# Altium PCB Carrier_Board_pcb.PcbDoc (part 2 of 2)
Units mm, origin at the board's own origin, x right, y up, seen from the top; angles counter-clockwise.
Board outline 152.4 x 101.6 mm, 4 copper layers (Top Layer, Power, Ground, Bottom Layer), stack 0.603 mm thick; 85 components, 79 nets, 632 pads, 232 vias.
Unrouted connection lines stored in the file: 1.
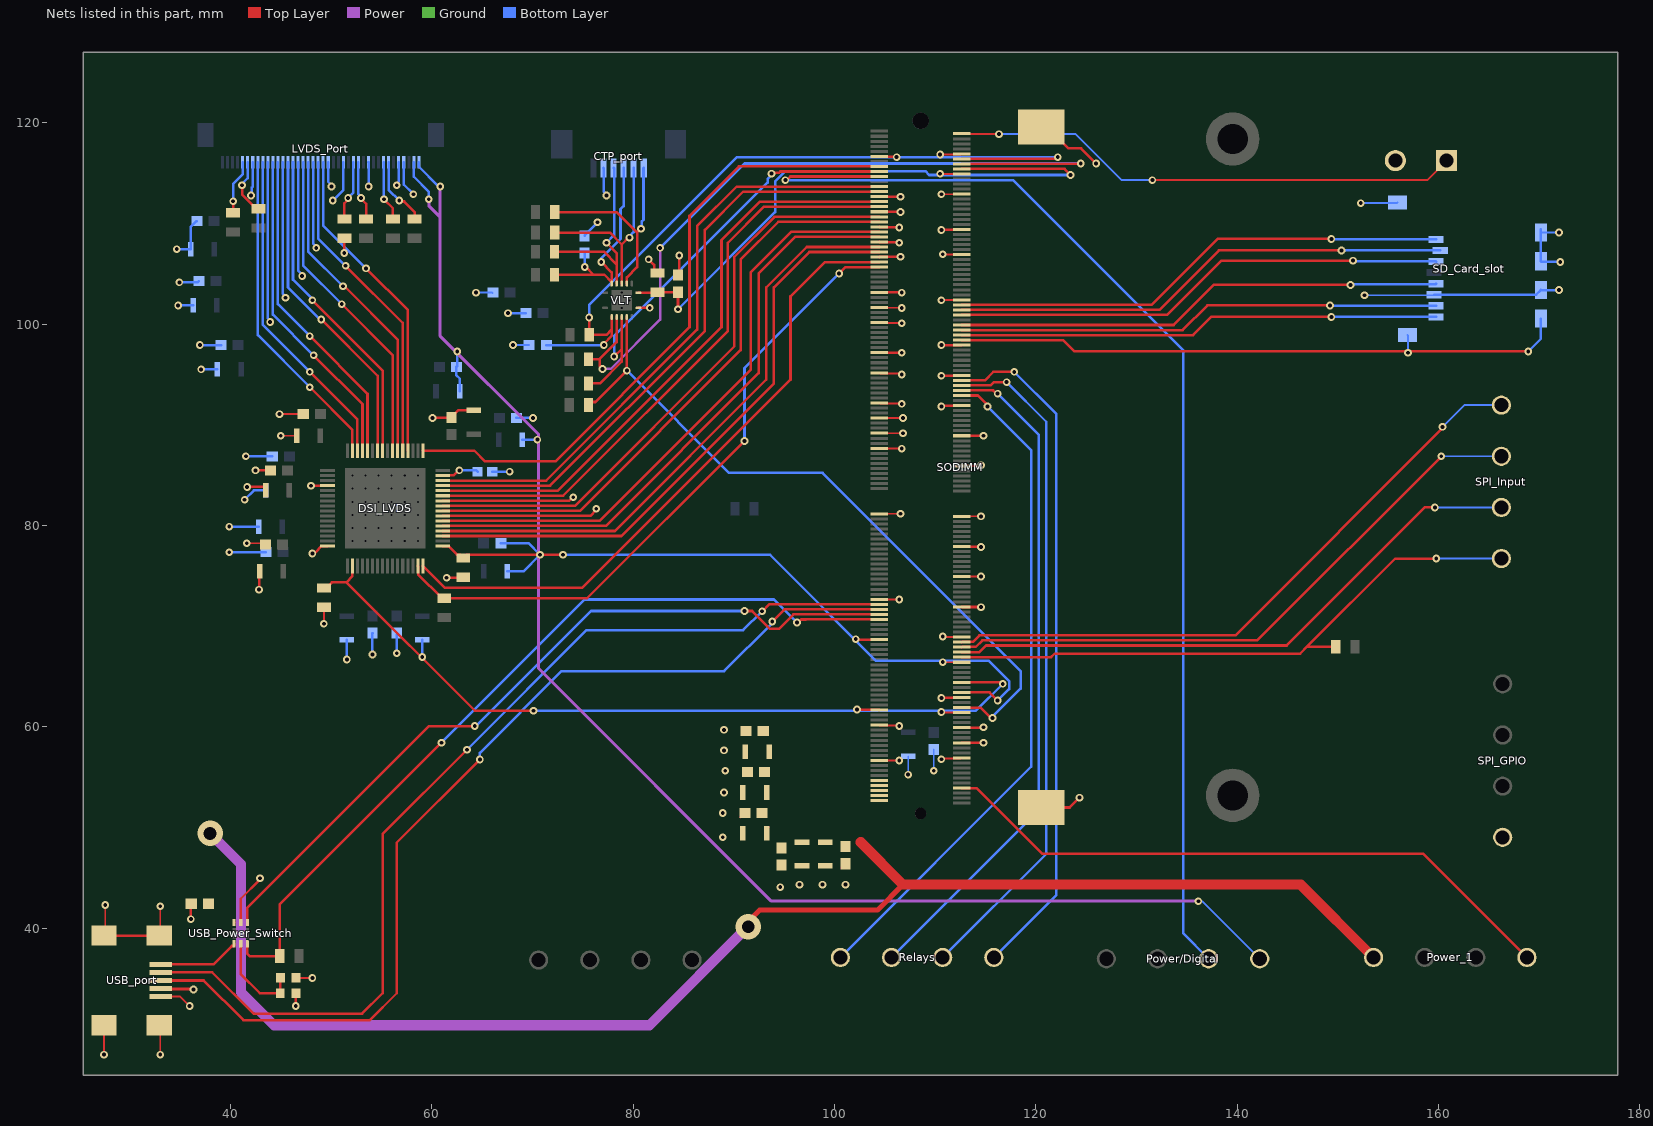
[diagram p4: the nets of this part, all layers, seen from the top]

## Via types
v1: diameter 0.762, hole 0.381, Top Layer to Bottom Layer, 83 vias
v2: diameter 0.762, hole 0.381, Top Layer to Ground, 82 vias
v3: diameter 0.762, hole 0.381, Ground to Bottom Layer, 41 vias
v4: diameter 0.762, hole 0.381, Top Layer to Power, 16 vias
v5: diameter 0.762, hole 0.381, Power to Bottom Layer, 8 vias
v6: diameter 2.54, hole 1.27, Top Layer to Power, 2 vias

## Nets (pads, with @x,y where several pads share a name; then routed paths per layer and width w, separated by ;. In a path a pad name is that pad's centre, name@x,y a point inside that pad or via, vN(x,y) a via of type N, cw(c..) or ccw(c..) an arc to the next point about the centre after c; other vN are vias at no path point) (continued)
GND: C1.1 C2.1 C3.1 C4.2 C5.2 C6.2 C7.2 C8.2 C9.2 C10.2 C11.2 C12.2 C13.2 C14.2 C15.2 C16.1 C17.1 C18.2 C19.2 C20.2 C21.2 C22.2 C23.2 C24.1 C25.1 C26.1 C27.2 C28.2 C29.2 C30.2 C31.2 C32.2 C33.2 C34.2 C35.2 C36.2 C37.2 C38.2 C39.2 C40.2 C41.2 C42.2 C43.2 C44.2 C45.2 C46.2 C47.1 CTP_port.2 DSI_LVDS.23 DSI_LVDS.26 DSI_LVDS.52 DSI_LVDS.64 GND/TEST.02 LVDS_Port.7 LVDS_Port.10 LVDS_Port.13 LVDS_Port.16 LVDS_Port.19 LVDS_Port.22 LVDS_Port.25 LVDS_Port.30 LVDS_Port.36 LVDS_Port.37 R5.2 R9.1 R10.1 R12.1 R22.2 R23.2 SD_Card_slot.6 SD_Card_slot.9 SD_Card_slot.10 SD_Card_slot.11 SD_Card_slot.13 SD_Card_slot.14 SODIMM.10 SODIMM.11 SODIMM.18 SODIMM.26 SODIMM.27 SODIMM.33 SODIMM.39 SODIMM.40 SODIMM.45 SODIMM.50 SODIMM.51 SODIMM.65 SODIMM.68 SODIMM.71 SODIMM.77 SODIMM.86 SODIMM.89 SODIMM.97 SODIMM.98 SODIMM.109 SODIMM.110 SODIMM.115 SODIMM.121 SODIMM.122 SODIMM.127 SODIMM.134 SODIMM.145 SODIMM.146 SODIMM.158 SODIMM.170 SODIMM.179 SODIMM.182 SODIMM.194 SODIMM.195 SODIMM.204 SODIMM.218 SODIMM.223 SODIMM.224 SODIMM.229 SODIMM.230 SODIMM.236 SODIMM.242 SODIMM.243 SODIMM.SH1 SODIMM.SH2 SPI_GPIO.4 USB_port.4 USB_port.5 USB_port.6 USB_port.7 USB_port.8 USB_port.9 USB_Power_Switch.5 VLT.7 | length 357.2
  Top Layer w0.178: v2(27.432,27.432) USB_port.9@27.433,30.348 USB_port.9@27.433,30.348 ; USB_port.8@27.433,39.248 27.559,39.374 v2(27.559,42.291) ; USB_port.7@32.933,30.348 33.02,30.261 v2(33.02,27.432) ; USB_port.6@32.933,39.248 33.02,39.335 v2(33.02,42.164) ; USB_port.5@33.058,33.198 35.001,33.198 v2(35.941,32.258) ; v2(41.617,78.232) 43.346,78.232 43.219,78.359 C12.2@43.522,78.359 ; v2(44.866,91.059) C11.2@47.23,91.059 ; v2(44.993,88.9) C34.2@46.574,88.9 ; R22.2@46.518,35.052 v2(48.133,35.052) ; v2(49.276,70.231) R10.1@49.276,71.877 ; C20.2@90.637,50.996 90.637,51.024 91.048,51.435 C20.2@91.098,51.435 ; C19.2@91.175,59.563 C19.2@91.225,59.563 C19.2@91.528,59.866 ; C18.2@91.302,55.499 C18.2@91.352,55.499 ; C22.2@100.681,45.939 101.092,46.35 C22.2@101.092,46.394 ; SODIMM.243@104.449,56.658 104.457,56.65 106.418,56.65 v2(106.426,56.642) ; SODIMM.229@104.449,60.158 104.493,60.115 106.382,60.115 v2(106.426,60.071) ; SODIMM.179@104.449,72.658 104.456,72.651 106.419,72.651 v2(106.426,72.644) ; SODIMM.145@104.449,81.158 104.452,81.155 106.551,81.155 v2(106.553,81.153) ; SODIMM.127@104.449,87.658 104.463,87.644 106.666,87.644 v2(106.68,87.63) ; SODIMM.121@104.449,89.158 104.451,89.156 106.805,89.156 v2(106.807,89.154) ; SODIMM.115@104.449,90.658 104.459,90.668 106.797,90.668 v2(106.807,90.678) ; SODIMM.109@104.449,92.158 104.491,92.117 106.638,92.117 v2(106.68,92.075) ; SODIMM.97@104.449,95.158 104.51,95.097 106.579,95.097 v2(106.68,94.996) ; SODIMM.77@104.449,100.158 104.49,100.117 106.639,100.117 v2(106.68,100.076) ; SODIMM.71@104.449,101.658 104.478,101.629 106.651,101.629 v2(106.68,101.6) ; v2(110.49,114.935) 110.504,114.921 112.635,114.921 SODIMM.18@112.649,114.908 ; v2(110.49,116.84) 111.759,116.84 111.766,116.847 112.588,116.847 SODIMM.10@112.649,116.908 ; v2(110.617,56.769) 110.695,56.847 112.588,56.847 SODIMM.242@112.649,56.908 ; v2(110.617,61.468) 110.677,61.408 SODIMM.224@112.649,61.408 ; v2(110.617,102.362) 110.64,102.385 112.626,102.385 SODIMM.68@112.649,102.408 ; v2(110.617,112.903) 110.619,112.905 112.647,112.905 SODIMM.26@112.649,112.908 ; v2(110.744,66.421) 110.751,66.414 112.642,66.414 SODIMM.204@112.649,66.408 ; v2(110.744,68.961) 110.797,68.908 SODIMM.194@112.649,68.908 ; v2(110.744,106.934) 110.757,106.921 112.636,106.921 SODIMM.50@112.649,106.908 ; SODIMM.170@112.649,74.908 112.66,74.919 114.543,74.919 v2(114.554,74.93) ; SODIMM.146@112.649,80.908 112.653,80.903 114.55,80.903 v2(114.554,80.899)
  Top Layer w0.254: USB_port.8@27.433,39.248 USB_port.6@32.933,39.248 ; USB_port.4@33.058,33.998 33.102,33.954 36.277,33.954 v2(36.322,33.909) ; v2(36.068,40.894) 36.068,42.379 C26.1@36.107,42.418 ; USB_Power_Switch.5@41.021,40.547 41.021,42.916 42.926,44.821 v2(42.926,44.958) ; v2(41.656,83.82) 43.344,83.82 43.493,83.67 C29.2@43.493,83.475 ; v2(42.48,85.471) C13.2@43.981,85.471 ; v2(42.834,73.625) 42.862,73.653 C35.2@42.862,75.41 ; v2(46.482,32.258) 46.5,32.276 R23.2@46.5,33.528 ; R23.2@46.482,33.51 R23.2@46.5,33.528 ; R23.2@46.518,33.546 R23.2@46.5,33.528 ; v2(48.006,83.947) DSI_LVDS.52@49.637,83.947 ; v2(48.133,77.216) 48.23,77.313 48.428,77.313 49.062,77.947 DSI_LVDS.64@49.637,77.947 ; v2(51.308,107.061) R12.1@51.308,108.519 ; v2(60.071,90.678) 61.927,90.678 C10.2@61.976,90.727 ; DSI_LVDS.23@61.087,80.947 75.75,80.947 76.327,81.524 v2(76.327,81.661) ; DSI_LVDS.26@61.087,82.447 73.638,82.447 73.995,82.804 v2(74.041,82.804) ; v2(61.468,74.803) 63.058,74.803 R9.1@63.119,74.864 ; C10.2@61.976,90.777 62.622,91.423 C33.2@64.177,91.423 ; VLT.7@80.517,101.612 v2@81.649,101.612 ; v2(81.534,106.426) 82.073,105.887 82.073,105.401 82.406,105.068 R5.2@82.423,105.068 ; C2.1@84.455,104.863 84.582,104.99 84.582,106.691 84.524,106.749 v2(84.582,106.807) ; v2(102.108,68.707) 102.157,68.658 SODIMM.195@104.449,68.658 ; v2(102.235,61.722) 102.276,61.681 104.426,61.681 SODIMM.223@104.449,61.658 ; SODIMM.89@104.449,97.158 SODIMM.89@104.449,97.158 106.679,97.156 v2(106.68,97.155) ; SODIMM.65@104.449,103.158 104.466,103.141 106.663,103.141 v2(106.68,103.124) ; SODIMM.51@104.449,106.658 104.46,106.669 106.542,106.669 v2(106.553,106.68) ; SODIMM.45@104.449,108.158 104.472,108.135 106.368,108.135 v2(106.426,108.077) ; SODIMM.39@104.449,109.658 104.472,109.635 106.392,109.635 v2(106.426,109.601) ; SODIMM.33@104.449,111.158 104.466,111.142 106.536,111.142 v2(106.553,111.125) ; SODIMM.27@104.449,112.658 106.544,112.658 v2(106.553,112.649) ; SODIMM.11@104.449,116.658 104.472,116.635 106.123,116.635 v2(106.172,116.586) ; v2(110.617,62.865) 110.638,62.886 112.628,62.886 SODIMM.218@112.649,62.908 ; v2(110.617,91.821) 110.681,91.885 112.626,91.885 SODIMM.110@112.649,91.908 ; v2(110.617,94.869) 110.637,94.889 112.629,94.889 SODIMM.98@112.649,94.908 ; v2(110.617,97.917) 110.621,97.913 112.645,97.913 SODIMM.86@112.649,97.908 ; v2(110.617,109.347) 110.655,109.385 112.626,109.385 SODIMM.40@112.649,109.408 ; SODIMM.236@112.649,58.408 112.655,58.414 114.802,58.414 v2(114.808,58.42) ; SODIMM.230@112.649,59.908 114.772,59.908 v2(114.808,59.944) ; SODIMM.182@112.649,71.908 112.662,71.895 114.541,71.895 v2(114.554,71.882) ; SODIMM.158@112.649,77.908 112.672,77.885 114.52,77.885 v2(114.554,77.851) ; SODIMM.134@112.649,85.908 112.672,85.931 114.506,85.931 v2(114.554,85.979) ; SODIMM.122@112.649,88.908 112.653,88.904 114.804,88.904 v2(114.808,88.9) ; SODIMM.SH2@120.549,51.983 123.357,51.983 v2(124.333,52.959) ; SODIMM.SH1@120.549,119.583 121.786,118.346 122.336,118.346 123.237,117.445 124.49,117.445 v2(125.984,115.951) ; SPI_GPIO.4@166.306,48.959 SPI_GPIO.4@166.37,49.022
  Ground w0.178: v3(45.466,102.616) v3@45.578,102.728 ; v3@53.657,113.602 v3(53.721,113.665) v3@53.785,113.602 ; v2(61.468,74.803) v2@61.626,74.803 ; v2@124.284,53.008 v2(124.333,52.959) v2@124.445,53.071
  Bottom Layer w0.178: v3(64.389,103.124) 66.001,103.124 C3.1@66.04,103.085 ; v3(68.072,97.917) C24.1@69.674,97.917 ; v3(107.315,55.245) C44.2@107.315,57.079 ; v3(109.855,55.626) C23.2@109.855,57.736 ; v3(152.273,112.014) 155.863,112.014 SD_Card_slot.13@155.914,112.065 ; v3(152.654,102.87) 159.523,102.87 SD_Card_slot.6@159.566,102.913 ; SD_Card_slot.14@156.914,98.915 156.972,98.857 v3(156.972,97.155) ; SD_Card_slot.9@170.17,109.089 170.174,109.093 v3(171.958,109.093)
  Bottom Layer w0.254: v3(34.671,107.442) C45.2@36.033,107.442 36.033,109.665 36.604,110.236 C16.1@36.654,110.236 ; v3(34.798,101.854) C46.2@36.287,101.854 ; v3(34.925,104.14) 36.742,104.14 C17.1@36.869,104.267 ; v3(36.957,97.917) C9.2@39.06,97.917 ; v3(37.084,95.504) C32.2@38.7,95.504 ; v3(39.878,77.343) C15.2@43.512,77.343 ; v3(39.878,79.883) C38.2@42.799,79.883 ; v3(41.402,82.55) 42.327,83.475 C37.2@43.493,83.475 ; v3(41.529,86.868) 44.147,86.868 C14.2@44.15,86.865 ; v3(42.037,112.776) 42.093,112.832 42.093,113.546 42.212,113.665 LVDS_Port.7@42.212,116.078 ; LVDS_Port.10@43.712,116.078 43.712,100.57 43.942,100.34 v3(43.942,100.203) ; LVDS_Port.13@45.212,116.078 45.212,103.007 45.466,102.753 v3(45.466,102.616) ; LVDS_Port.16@46.712,116.078 46.712,105.317 47.117,104.912 v3(47.117,104.775) ; LVDS_Port.19@48.212,116.078 48.212,108.008 48.514,107.706 v3(48.514,107.569) ; LVDS_Port.22@49.712,116.078 49.712,114.128 50.038,113.802 v3(50.038,113.665) ; v3(50.165,112.268) 51.212,113.315 LVDS_Port.25@51.212,116.078 ; v3(51.562,66.675) C27.2@51.562,68.639 ; LVDS_Port.30@53.712,116.078 53.717,116.074 53.717,113.669 v3(53.721,113.665) ; v3(54.102,67.183) 54.102,69.293 C4.2@54.105,69.296 ; v3(56.515,67.31) C5.2@56.515,69.293 ; v3(56.515,113.792) 56.515,113.929 56.712,114.126 LVDS_Port.36@56.712,116.078 ; LVDS_Port.37@57.212,116.078 57.212,113.857 v3(58.166,112.903) ; v3(59.055,66.929) C28.2@59.055,68.636 ; C8.2@62.445,95.758 62.445,94.908 62.773,94.58 C31.2@62.773,93.345 ; C8.2@62.523,95.836 v3(62.523,97.282) ; C47.1@66.003,85.344 v3(67.728,85.344) ; C6.2@66.851,78.232 69.596,78.232 v3(70.739,77.089) 69.088,75.438 C36.2@67.508,75.438 ; v3(67.564,101.092) C25.1@69.342,101.092 ; C7.2@68.414,90.678 v3(70.051,90.678) ; C30.2@68.996,88.519 v3(70.485,88.519) ; C1.1@75.184,108.761 75.184,108.811 76.454,110.081 v3(76.454,110.109) ; CTP_port.2@77.051,115.506 77.07,115.487 77.07,113.186 77.343,112.913 v3(77.343,112.776) ; SD_Card_slot.6@159.566,102.913 169.7,102.913 170.17,103.383 SD_Card_slot.11@170.17,103.389 170.181,103.378 v3(171.958,103.378) ; SD_Card_slot.9@170.17,109.394 SD_Card_slot.9@170.17,109.089 SD_Card_slot.10@170.17,106.239 170.237,106.172 v3(172.085,106.172)
  other v2: 94.615,44.069 96.52,44.323 98.806,44.323 101.092,44.323 88.9,49.022 88.9,51.435 89.027,53.467 89.154,55.626 89.027,57.658 89.027,59.69 81.655,101.606
LCD_BL_PWM_carrier: Power/Digital.2 SODIMM.19 | length 117.5
  Top Layer w0.254: v1(95.123,114.3) 95.26,114.3 95.618,114.658 SODIMM.19@104.449,114.658
  Bottom Layer w0.254: v1(95.123,114.3) 117.729,114.3 134.62,97.409 134.62,39.497 Power/Digital.2@137.16,36.957
LED_Backlight: LVDS_Port.39 LVDS_Port.40 Power/Digital.1 | length 145.4
  Power w0.178: v5(59.69,112.395) v5@59.703,112.382
  Power w0.305: v5@59.703,112.382 59.703,111.747 60.833,110.617 ; v5(60.833,113.665) 60.833,110.617 ; v5(136.144,42.672) 93.726,42.672 70.612,65.786 70.612,89.027 60.833,98.806 60.833,110.617
  Bottom Layer w0.178: v5(136.144,42.672) 136.525,42.672 Power/Digital.1@142.24,36.957
  Bottom Layer w0.254: LVDS_Port.39@58.212,116.078 58.212,114.635 59.69,113.157 v5(59.69,112.395) ; LVDS_Port.40@58.712,116.078 58.712,115.628 60.578,113.762 60.736,113.762 v5(60.833,113.665)
NetC1_2: C1.2 CTP_port.4 R18.2 VLT.13 | length 21.5
  Top Layer w0.254: R18.2@72.2,104.902 76.073,104.902 ; v1(75.184,105.664) 75.311,105.664 76.073,104.902 ; v1(76.835,106.172) 77.867,105.14 VLT.13@77.867,104.178 ; VLT.13@77.867,104.138 VLT.13@77.867,104.012 VLT.13@77.867,104.178 ; 76.073,104.902 77.143,104.902 VLT.13@77.867,104.178
  Bottom Layer w0.254: v1(75.184,105.664) C1.2@75.184,107.061 ; v1(76.835,106.172) 76.84,106.177 76.84,106.558 78.74,108.458 78.74,111.415 79.051,111.726 CTP_port.4@79.051,115.506
NetC2_2: C2.2 R5.1 SODIMM.16 VLT.8 | length 63.3
  Top Layer w0.254: VLT.8@80.517,103.112 82.377,103.112 R5.1@82.423,103.158 82.428,103.163 C2.2@84.455,103.163 v1(84.455,101.473) ; SODIMM.16@112.649,115.408 122.844,115.408 v1(123.444,114.808)
  Bottom Layer w0.254: v1(84.455,101.473) 94.107,111.125 94.107,114.182 95.114,115.189 109.02,115.189 109.401,114.808 v1(123.444,114.808)
NetC24_2: C24.2 R20.1 SODIMM.12 VLT.2 | length 76.4
  Top Layer w0.254: v1(75.629,100.647) R20.1@75.629,98.933 77.343,98.933 77.867,99.457 ; v1@77.089,98.044 77.867,98.822 77.867,99.457 ; VLT.2@77.867,100.712 77.867,99.457 ; SODIMM.12@112.649,116.408 121.859,116.408 122.037,116.586 v1(122.174,116.586)
  Bottom Layer w0.254: C24.2@71.374,97.917 71.413,97.878 77.05,97.878 v1(77.089,97.917) ; v1(75.629,100.647) 75.629,101.917 90.297,116.586 v1(122.174,116.586)
NetC47_2: C47.2 DSI_LVDS.31 | length 3.7
  Top Layer w0.254: DSI_LVDS.31@61.087,84.947 61.11,84.97 62.161,84.97 62.662,85.471 v1(62.738,85.471)
  Bottom Layer w0.254: v1(62.738,85.471) 64.426,85.471 C47.2@64.553,85.344
NetCTP_port_3: CTP_port.3 R17.2 VLT.12 | length 19
  Top Layer w0.254: R17.2@72.2,107.188 77.089,107.188 78.367,105.91 ; v1(77.343,108.077) 78.367,107.053 78.367,105.91 ; VLT.12@78.367,104.012 78.367,105.91
  Bottom Layer w0.254: v1(77.343,108.077) 78.105,108.839 78.105,115.452 CTP_port.3@78.051,115.506
NetCTP_port_5: CTP_port.5 R4.1 VLT.11 | length 19.2
  Top Layer w0.254: R4.1@72.202,109.093 77.68,109.093 78.867,107.906 ; VLT.11@78.867,104.012 78.867,107.906 ; v1(79.629,108.585) 79.546,108.585 78.867,107.906
  Bottom Layer w0.254: v1(79.629,108.585) 79.629,108.722 80.051,109.144 CTP_port.5@80.051,115.506
NetCTP_port_6: CTP_port.6 R3.1 VLT.10 | length 21.2
  Top Layer w0.254: R3.1@72.202,111.125 78.343,111.125 80.391,109.077 ; VLT.10@79.367,104.012 79.367,104.64 80.391,105.664 80.391,109.077 ; v1(80.772,109.474) 80.772,109.458 80.391,109.077
  Bottom Layer w0.254: v1(80.772,109.474) 80.869,109.571 80.869,110.206 81.026,110.363 81.026,115.481 CTP_port.6@81.051,115.506
NetDSI_LVDS_2: DSI_LVDS.2 R10.2 SODIMM.212 | length 80.1
  Top Layer w0.254: R10.2@49.276,73.787 49.506,73.787 50.071,74.352 51.505,74.352 ; DSI_LVDS.2@52.112,75.972 52.112,74.959 51.505,74.352 ; v1(70.104,61.595) 64.262,61.595 51.505,74.352 ; SODIMM.212@112.649,64.408 116.43,64.408 116.576,64.262 v1(116.713,64.262)
  Bottom Layer w0.254: v1(70.104,61.595) 114.046,61.595 v1(116.713,64.262)
NetDSI_LVDS_15: DSI_LVDS.15 R21.1 SODIMM.55 | length 65.5
  Top Layer w0.254: DSI_LVDS.15@58.612,75.972 58.635,75.949 58.635,75.134 60.998,72.771 R21.1@61.214,72.771 75.438,72.771 v1(91.059,88.392) ; v1(100.457,105.029) 101.086,105.658 SODIMM.55@104.449,105.658
  Bottom Layer w0.254: v1(91.059,88.392) 91.059,95.631 v1(100.457,105.029)
NetDSI_LVDS_16: DSI_LVDS.16 SODIMM.53 | length 64.5
  Top Layer w0.254: DSI_LVDS.16@59.112,75.972 61.297,73.787 74.93,73.787 95.631,94.488 95.631,102.743 99.046,106.158 SODIMM.53@104.449,106.158
NetDSI_LVDS_17: DSI_LVDS.17 R9.2 SODIMM.216 | length 68.4
  Top Layer w0.254: DSI_LVDS.17@61.087,77.947 61.662,77.947 62.502,77.107 62.786,77.107 R9.2@63.119,76.774 63.434,77.089 v1(73.025,77.089) ; SODIMM.216@112.649,63.408 115.408,63.408 v1(116.2,62.616)
  Bottom Layer w0.254: v1(73.025,77.089) 93.599,77.089 104.14,66.548 115.325,66.548 117.348,64.525 117.348,63.754 116.21,62.616 v1(116.2,62.616)
NetDSI_LVDS_19: DSI_LVDS.19 SODIMM.49 | length 60.6
  Top Layer w0.254: DSI_LVDS.19@61.087,78.947 78.82,78.947 93.98,94.107 93.98,103.632 97.506,107.158 SODIMM.49@104.449,107.158
NetDSI_LVDS_20: DSI_LVDS.20 SODIMM.47 | length 60.4
  Top Layer w0.254: DSI_LVDS.20@61.087,79.447 78.177,79.447 93.218,94.488 93.218,103.632 97.244,107.658 SODIMM.47@104.449,107.658
NetDSI_LVDS_21: DSI_LVDS.21 SODIMM.43 | length 61.1
  Top Layer w0.254: DSI_LVDS.21@61.087,79.947 77.28,79.947 92.456,95.123 92.456,105.029 96.085,108.658 SODIMM.43@104.449,108.658
NetDSI_LVDS_22: DSI_LVDS.22 SODIMM.41 | length 60.9
  Top Layer w0.254: DSI_LVDS.22@61.087,80.447 76.637,80.447 91.694,95.504 91.694,105.156 95.696,109.158 SODIMM.41@104.449,109.158
NetDSI_LVDS_24: DSI_LVDS.24 SODIMM.37 | length 60.5
  Top Layer w0.254: DSI_LVDS.24@61.087,81.447 61.11,81.47 61.805,81.47 61.814,81.479 74.748,81.479 90.678,97.409 90.678,106.426 94.41,110.158 SODIMM.37@104.449,110.158
NetDSI_LVDS_25: DSI_LVDS.25 SODIMM.35 | length 60.5
  Top Layer w0.254: DSI_LVDS.25@61.087,81.947 74.2,81.947 90.043,97.79 90.043,106.68 94.021,110.658 SODIMM.35@104.449,110.658
NetDSI_LVDS_27: DSI_LVDS.27 SODIMM.31 | length 60.4
  Top Layer w0.254: DSI_LVDS.27@61.087,82.947 73.041,82.947 89.408,99.314 89.408,108.077 92.989,111.658 SODIMM.31@104.449,111.658
NetDSI_LVDS_28: DSI_LVDS.28 SODIMM.29 | length 60.3
  Top Layer w0.254: DSI_LVDS.28@61.087,83.447 72.525,83.447 88.773,99.695 88.773,108.331 92.6,112.158 SODIMM.29@104.449,112.158
NetDSI_LVDS_29: DSI_LVDS.29 SODIMM.25 | length 61.3
  Top Layer w0.254: DSI_LVDS.29@61.087,83.947 71.755,83.947 87.122,99.314 87.122,109.347 90.933,113.158 SODIMM.25@104.449,113.158
NetDSI_LVDS_30: DSI_LVDS.30 SODIMM.23 | length 61.5
  Top Layer w0.254: DSI_LVDS.30@61.087,84.447 71.366,84.447 86.36,99.441 86.36,109.728 90.29,113.658 SODIMM.23@104.449,113.658
NetDSI_LVDS_33: DSI_LVDS.33 SODIMM.15 | length 64.4
  Top Layer w0.254: DSI_LVDS.33@59.112,87.422 64.216,87.422 65.278,86.36 72.263,86.36 85.598,99.695 85.598,110.744 90.512,115.658 SODIMM.15@104.449,115.658
NetDSI_LVDS_36: DSI_LVDS.36 LVDS_Port.21 | length 32.1
  Top Layer w0.254: v1(53.467,105.537) 57.612,101.392 DSI_LVDS.36@57.612,87.422
  Bottom Layer w0.254: LVDS_Port.21@49.212,116.078 49.212,109.792 v1(53.467,105.537)
NetDSI_LVDS_37: DSI_LVDS.37 LVDS_Port.20 | length 32.1
  Top Layer w0.254: v1(51.435,105.791) 57.112,100.114 DSI_LVDS.37@57.112,87.422
  Bottom Layer w0.254: LVDS_Port.20@48.712,116.078 48.712,108.514 v1(51.435,105.791)
NetDSI_LVDS_38: DSI_LVDS.38 LVDS_Port.18 | length 32.4
  Top Layer w0.254: v1(51.181,103.759) 51.308,103.759 56.612,98.455 DSI_LVDS.38@56.612,87.422
  Bottom Layer w0.254: LVDS_Port.18@47.712,116.078 47.712,107.228 v1(51.181,103.759)
NetDSI_LVDS_39: DSI_LVDS.39 LVDS_Port.17 | length 32.3
  Top Layer w0.254: v1(51.054,101.981) 56.112,96.923 DSI_LVDS.39@56.112,87.422
  Bottom Layer w0.254: LVDS_Port.17@47.212,116.078 47.212,105.823 v1(51.054,101.981)
NetDSI_LVDS_41: DSI_LVDS.41 LVDS_Port.15 | length 32.3
  Top Layer w0.254: v1(48.133,102.362) 55.112,95.383 DSI_LVDS.41@55.112,87.422
  Bottom Layer w0.254: LVDS_Port.15@46.212,116.078 46.212,104.41 48.133,102.489 v1(48.133,102.362)
NetDSI_LVDS_42: DSI_LVDS.42 LVDS_Port.14 | length 32.4
  Top Layer w0.254: v1(49.022,100.457) 54.612,94.867 DSI_LVDS.42@54.612,87.422
  Bottom Layer w0.254: LVDS_Port.14@45.712,116.078 45.712,103.64 48.895,100.457 v1(49.022,100.457)
NetDSI_LVDS_44: DSI_LVDS.44 LVDS_Port.12 | length 32.3
  Top Layer w0.254: v1(47.879,98.806) 53.612,93.073 DSI_LVDS.44@53.612,87.422
  Bottom Layer w0.254: LVDS_Port.12@44.712,116.078 44.712,101.973 v1(47.879,98.806)
NetDSI_LVDS_45: DSI_LVDS.45 LVDS_Port.11 | length 32.3
  Top Layer w0.254: v1(48.26,96.901) 53.112,92.049 DSI_LVDS.45@53.112,87.422
  Bottom Layer w0.254: LVDS_Port.11@44.212,116.078 44.212,100.949 v1(48.26,96.901)
NetDSI_LVDS_46: DSI_LVDS.46 LVDS_Port.9 | length 32.5
  Top Layer w0.254: v1(47.879,95.25) 52.612,90.517 DSI_LVDS.46@52.612,87.422
  Bottom Layer w0.254: LVDS_Port.9@43.212,116.078 43.212,99.917 v1(47.879,95.25)
NetDSI_LVDS_47: DSI_LVDS.47 LVDS_Port.8 | length 32.5
  Top Layer w0.254: v1(47.879,93.726) 52.112,89.493 DSI_LVDS.47@52.112,87.422
  Bottom Layer w0.254: LVDS_Port.8@42.712,116.078 42.712,98.893 v1(47.879,93.726)
NetGND/TEST_01: GND/TEST.01 SODIMM.2 | length 50.9
  Top Layer w0.178: SODIMM.2@112.649,118.908 112.667,118.89 116.314,118.89 v1(116.332,118.872) ; v1(131.572,114.3) 158.86,114.3 GND/TEST.01@160.798,116.238
  Bottom Layer w0.178: v1(116.332,118.872) 123.952,118.872 128.524,114.3 v1(131.572,114.3)
NetLVDS_Port_5: LVDS_Port.5 R7.2 | length 5.4
  Top Layer w0.254: R7.2@40.259,111.064 v1(40.259,112.207)
  Bottom Layer w0.254: v1(40.259,112.207) 40.259,113.919 41.212,114.872 LVDS_Port.5@41.212,116.078
NetLVDS_Port_6: LVDS_Port.6 R8.2 | length 5.7
  Top Layer w0.254: v1(41.148,113.792) 41.148,112.866 42.569,111.445 R8.2@42.799,111.445
  Bottom Layer w0.254: v1(41.148,113.792) 41.148,113.921 41.712,114.485 LVDS_Port.6@41.712,116.078
NetLVDS_Port_27: LVDS_Port.27 R12.2 | length 6
  Top Layer w0.254: R12.2@51.308,110.429 51.308,112.004 51.689,112.385 v1(51.689,112.522)
  Bottom Layer w0.254: v1(51.689,112.522) 51.689,112.554 52.212,113.077 LVDS_Port.27@52.212,116.078
NetLVDS_Port_28: LVDS_Port.28 R11.2 | length 6
  Top Layer w0.254: v1(52.959,112.522) 52.959,112.46 53.467,111.952 R11.2@53.467,110.429
  Bottom Layer w0.254: LVDS_Port.28@52.712,116.078 52.712,112.906 52.959,112.659 v1(52.959,112.522)
NetLVDS_Port_33: LVDS_Port.33 R13.2 | length 6
  Top Layer w0.254: v1(55.245,112.395) 56.134,111.506 R13.2@56.134,110.429
  Bottom Layer w0.254: LVDS_Port.33@55.212,116.078 55.228,116.061 55.228,112.412 v1(55.245,112.395)
NetLVDS_Port_34: LVDS_Port.34 R14.2 | length 6.9
  Top Layer w0.254: v1(56.769,112.268) 56.863,112.174 57.244,112.174 58.293,111.125 R14.2@58.293,110.429
  Bottom Layer w0.254: LVDS_Port.34@55.712,116.078 55.712,113.325 v1(56.769,112.268)
NetR1_1: R1.1 SODIMM.17 VLT.4 | length 45.2
  Top Layer w0.254: R1.1@75.565,94.107 76.708,94.107 78.867,96.266 78.867,97.536 ; v1(78.105,96.774) 78.867,97.536 ; VLT.4@78.867,100.712 78.867,97.536 ; v1(93.734,114.942) 93.823,115.031 94.496,115.031 94.623,115.158 SODIMM.17@104.449,115.158
  Bottom Layer w0.254: v1(78.105,96.774) 78.105,98.806 93.359,114.06 93.359,114.43 93.734,114.805 v1(93.734,114.942)
NetR2_1: R2.1 SODIMM.222 VLT.5 | length 71.3
  Top Layer w0.254: R2.1@75.565,91.948 75.876,92.259 76.257,92.259 79.367,95.369 VLT.5@79.367,100.712 ; SODIMM.222@112.649,61.908 114.523,61.908 115.56,60.871 v1(115.697,60.871)
  Bottom Layer w0.254: v1(79.375,95.377) 89.535,85.217 98.806,85.217 118.491,65.532 118.491,63.803 115.697,61.009 v1(115.697,60.871)
NetR16_1: R16.1 SODIMM.187 USB_Power_Switch.3 | length 82.6
  Top Layer w0.254: USB_Power_Switch.3@41.671,38.447 41.671,37.45 41.91,37.211 R16.1@44.892,37.211 44.892,42.352 v1(60.96,58.42) ; v1(96.266,70.358) 96.37,70.358 96.669,70.657 97.154,70.657 97.155,70.658 SODIMM.187@104.449,70.658
  Bottom Layer w0.254: v1(60.96,58.42) 75.184,72.644 93.98,72.644 v1(96.266,70.358)
NetR19_1: R19.1 SODIMM.14 VLT.3 | length 79
  Top Layer w0.254: R19.1@75.565,96.52 76.664,96.52 ; v4(76.962,95.544) 76.664,95.841 76.664,96.52 ; VLT.3@78.367,100.712 78.367,98.223 76.664,96.52 ; SODIMM.14@112.649,115.908 112.67,115.93 124.439,115.93 v1(124.46,115.951)
  Power w0.254: v4(76.962,95.544) 77.773,95.544 82.677,100.448 v5(82.677,107.569)
  Bottom Layer w0.254: v5(82.677,107.569) 91.059,115.951 v1(124.46,115.951)
NetR22_1: R22.1 R23.1 USB_Power_Switch.2 | length 9.3
  Top Layer w0.254: USB_Power_Switch.2@41.021,38.447 41.006,38.432 41.006,35.448 42.926,33.528 R23.1@44.94,33.528 44.958,33.546 R22.1@44.958,35.052
NetSD_Card_slot_1: SD_Card_slot.1 SODIMM.70 | length 49.8
  Top Layer w0.254: SODIMM.70@112.649,101.908 131.499,101.908 138.049,108.458 v1(149.352,108.458)
  Bottom Layer w0.254: v1(149.352,108.458) 149.397,108.413 SD_Card_slot.1@159.766,108.413
NetSD_Card_slot_2: SD_Card_slot.2 SODIMM.72 | length 50
  Top Layer w0.254: SODIMM.72@112.649,101.408 132.269,101.408 138.176,107.315 v1(150.368,107.315)
  Bottom Layer w0.254: v1(150.368,107.315) 155.313,107.315 155.315,107.313 SD_Card_slot.2@160.166,107.313
NetSD_Card_slot_3: SD_Card_slot.3 SODIMM.74 | length 49.4
  Top Layer w0.254: SODIMM.74@112.649,100.908 133.039,100.908 138.43,106.299 v1(151.511,106.299)
  Bottom Layer w0.254: v1(151.511,106.299) 151.554,106.256 159.723,106.256 SD_Card_slot.3@159.766,106.213
NetSD_Card_slot_5: SD_Card_slot.5 SODIMM.78 | length 48.8
  Top Layer w0.254: SODIMM.78@112.649,99.908 133.69,99.908 137.668,103.886 v1(151.257,103.886)
  Bottom Layer w0.254: v1(151.257,103.886) 151.32,103.95 159.702,103.95 SD_Card_slot.5@159.766,104.013
NetSD_Card_slot_7: SD_Card_slot.7 SODIMM.80 | length 48.1
  Top Layer w0.254: SODIMM.80@112.649,99.408 134.587,99.408 137.033,101.854 v1(149.225,101.854)
  Bottom Layer w0.254: v1(149.225,101.854) 149.246,101.833 159.745,101.833 SD_Card_slot.7@159.766,101.813
NetSD_Card_slot_8: SD_Card_slot.8 SODIMM.82 | length 47.9
  Top Layer w0.254: SODIMM.82@112.649,98.908 135.611,98.908 137.414,100.711 v1(149.352,100.711)
  Bottom Layer w0.254: v1(149.352,100.711) v1(149.352,100.711) 159.765,100.712 SD_Card_slot.8@159.766,100.713
NetSD_Card_slot_12: SD_Card_slot.12 SODIMM.84 | length 60.5
  Top Layer w0.254: SODIMM.84@112.649,98.408 122.699,98.408 123.825,97.282 v1(168.91,97.282)
  Bottom Layer w0.254: v1(168.91,97.282) 170.17,98.542 SD_Card_slot.12@170.17,100.539
NetSODIMM_181: SODIMM.181 USB_port.2 | length 99.2
  Top Layer w0.254: USB_port.2@33.058,35.598 38.189,35.598 42.291,31.496 53.086,31.496 55.118,33.528 55.118,49.335 v1(63.5,57.717) ; v1(92.806,71.47) 92.824,71.47 93.512,72.158 SODIMM.181@104.449,72.158
  Bottom Layer w0.254: v1(63.5,57.717) 75.379,69.596 90.932,69.596 v1(92.806,71.47)
NetSODIMM_183: SODIMM.183 USB_port.3 | length 99.1
  Top Layer w0.254: USB_port.3@33.058,34.798 37.338,34.798 41.275,30.861 53.848,30.861 56.515,33.528 56.515,48.501 v1(64.77,56.756) ; v1(93.822,70.454) 95.026,71.658 SODIMM.183@104.449,71.658
  Bottom Layer w0.254: v1(64.77,56.756) 64.77,57.404 72.898,65.532 89.027,65.532 93.822,70.327 v1(93.822,70.454)
NetSODIMM_185: SODIMM.185 USB_Power_Switch.4 | length 77.8
  Top Layer w0.254: USB_Power_Switch.4@41.671,40.547 41.671,42.043 59.699,60.071 v1(64.262,60.071) ; v1(91.059,71.501) 91.826,71.501 93.604,69.723 94.488,69.723 95.923,71.158 SODIMM.185@104.449,71.158
  Bottom Layer w0.254: v1(64.262,60.071) 64.389,60.071 75.819,71.501 v1(91.059,71.501)
NetUSB_port_1: USB_port.1 USB_Power_Switch.1 | length 8.3
  Top Layer w0.254: USB_port.1@33.058,36.398 38.322,36.398 40.148,38.224 40.348,38.224 40.371,38.247 USB_Power_Switch.1@40.371,38.447
power_pcnb_control_3.3V_buck: Power_1.4 SODIMM.254 | length 63.1
  Top Layer w0.254: SODIMM.254@112.649,53.908 114.113,53.908 120.65,47.371 158.496,47.371 Power_1.4@168.783,37.084
Relay_1: Relays.1 SODIMM.100 | length 68
  Top Layer w0.254: SODIMM.100@112.649,94.408 114.926,94.408 115.768,95.25 v1(117.856,95.25)
  Bottom Layer w0.254: Relays.1@115.824,37.084 122.047,43.307 122.047,91.059 v1(117.856,95.25)
Relay_2: Relays.2 SODIMM.102 | length 67.6
  Top Layer w0.254: SODIMM.102@112.649,93.908 115.498,93.908 115.824,94.234 v1(117.094,94.234)
  Bottom Layer w0.254: Relays.2@110.744,37.084 121.031,47.371 121.031,90.297 v1(117.094,94.234)
Relay_3: Relays.3 SODIMM.104 | length 67.4
  Top Layer w0.254: SODIMM.104@112.649,93.408 115.751,93.408 116.068,93.091 v1(116.205,93.091)
  Bottom Layer w0.254: Relays.3@105.664,37.084 120.269,51.689 120.269,89.027 v1(116.205,93.091)
Relay_4: Relays.4 SODIMM.106 | length 67.5
  Top Layer w0.254: SODIMM.106@112.649,92.908 114.239,92.908 115.189,91.958 v1(115.189,91.821)
  Bottom Layer w0.254: Relays.4@100.584,37.084 119.529,56.029 119.529,87.481 v1(115.189,91.821)
SPI1_clk: SODIMM.196 SPI_Input.1 | length 63.4
  Top Layer w0.254: SODIMM.196@112.649,68.408 112.672,68.431 113.737,68.431 114.394,69.088 139.827,69.088 160.401,89.662 v1(160.401,89.789)
  Bottom Layer w0.178: v1(160.401,89.789) 162.56,91.948 SPI_Input.1@166.243,91.948
SPI1_CS: R15.2 SODIMM.202 SPI_Input.4 | length 60.5
  Top Layer w0.254: SODIMM.202@112.649,66.908 121.509,66.908 121.856,67.255 146.249,67.255 147.002,68.008 ; R15.2@149.794,67.945 147.066,67.945 147.002,68.008 ; v1(159.766,76.708) 155.702,76.708 147.002,68.008
  Bottom Layer w0.178: v1(159.766,76.708) SPI_Input.4@166.243,76.708
SPI1_MISO: SODIMM.198 SPI_Input.2 | length 61.4
  Top Layer w0.254: SODIMM.198@112.649,67.908 112.672,67.931 114.032,67.931 114.681,68.58 141.986,68.58 v1(160.274,86.868)
  Bottom Layer w0.178: v1(160.274,86.868) SPI_Input.2@166.243,86.868
SPI1_MOSI: SODIMM.200 SPI_Input.3 | length 59.6
  Top Layer w0.254: SODIMM.200@112.649,67.408 114.398,67.408 115.062,68.072 144.907,68.072 158.623,81.788 v1(159.639,81.788)
  Bottom Layer w0.178: v1(159.639,81.788) SPI_Input.3@166.243,81.788
VOUT_5V_carrier: C18.1 C19.1 C20.1 C21.1 C22.1 C26.2 C39.1 C40.1 C41.1 C42.1 C43.1 Power_1.1 SODIMM.251 SODIMM.253 SODIMM.255 SODIMM.257 SODIMM.259 USB_Power_Switch.6 | length 146.6
  Top Layer w0.254: USB_Power_Switch.6@40.371,40.547 USB_Power_Switch.6@40.386,40.562 ; C18.1@93.052,55.499 C18.1@93.108,55.555 ; C41.1@93.253,49.85 C41.1@93.403,50 ; C21.1@94.668,47.893 94.869,47.918 C21.1@94.816,48.041
  Top Layer w0.508: v6(91.44,40.132) 91.44,40.682 92.541,41.783 104.267,41.783 106.807,44.323
  Top Layer w1.016: 102.6,48.53 106.807,44.323 146.304,44.323 Power_1.1@153.543,37.084
  Power w1.016: v6(37.973,49.403) 41.04,46.336 41.04,33.636 44.323,30.353 81.62,30.353 91.399,40.132 v6(91.44,40.132)
pads on no net: CTP_port.P1 CTP_port.P2 DSI_LVDS.1 DSI_LVDS.4 DSI_LVDS.5 DSI_LVDS.6 DSI_LVDS.7 DSI_LVDS.8 DSI_LVDS.9 DSI_LVDS.10 DSI_LVDS.11 DSI_LVDS.12 DSI_LVDS.13 DSI_LVDS.34 DSI_LVDS.50 DSI_LVDS.51 DSI_LVDS.53 DSI_LVDS.54 DSI_LVDS.56 DSI_LVDS.57 DSI_LVDS.59 DSI_LVDS.60 DSI_LVDS.61 DSI_LVDS.62 DSI_LVDS.65 DSI_LVDS.V LVDS_Port.1 LVDS_Port.4 LVDS_Port.23 LVDS_Port.24 LVDS_Port.26 LVDS_Port.29 LVDS_Port.31 LVDS_Port.32 LVDS_Port.35 LVDS_Port.38 LVDS_Port.P1 LVDS_Port.P2 SODIMM. SODIMM.1 SODIMM.3 SODIMM.4 SODIMM.5 SODIMM.6 SODIMM.7 SODIMM.8 SODIMM.9 SODIMM.13 SODIMM.20 SODIMM.21 SODIMM.22 SODIMM.24 SODIMM.28 SODIMM.30 SODIMM.32 SODIMM.34 SODIMM.36 SODIMM.38 SODIMM.42 SODIMM.44 SODIMM.46 SODIMM.48 SODIMM.52 SODIMM.54 SODIMM.56 SODIMM.57 SODIMM.58 SODIMM.59 SODIMM.60 SODIMM.61 SODIMM.62 SODIMM.63 SODIMM.64 SODIMM.66 SODIMM.67 SODIMM.69 SODIMM.73 SODIMM.75 SODIMM.76 SODIMM.79 SODIMM.81 SODIMM.83 SODIMM.85 SODIMM.87 SODIMM.88 SODIMM.90 SODIMM.91 SODIMM.92 SODIMM.93 SODIMM.94 SODIMM.95 SODIMM.96 SODIMM.99 SODIMM.101 SODIMM.103 SODIMM.105 SODIMM.107 SODIMM.108 SODIMM.111 SODIMM.112 SODIMM.113 SODIMM.114 SODIMM.116 SODIMM.117 SODIMM.118 SODIMM.119 SODIMM.120 SODIMM.123 SODIMM.124 SODIMM.125 SODIMM.126 SODIMM.128 SODIMM.129 SODIMM.130 SODIMM.131 SODIMM.132 SODIMM.133 SODIMM.135 SODIMM.136 SODIMM.138 SODIMM.140 SODIMM.142 SODIMM.144 SODIMM.147 SODIMM.148 SODIMM.149 SODIMM.150 SODIMM.151 SODIMM.152 SODIMM.153 SODIMM.154 SODIMM.155 SODIMM.156 SODIMM.157 SODIMM.159 SODIMM.160 SODIMM.161 SODIMM.162 SODIMM.163 SODIMM.164 SODIMM.165 SODIMM.166 SODIMM.167 SODIMM.168 SODIMM.169 SODIMM.171 SODIMM.172 SODIMM.173 SODIMM.174 SODIMM.175 SODIMM.176 SODIMM.177 SODIMM.178 SODIMM.180 SODIMM.184 SODIMM.186 SODIMM.188 SODIMM.189 SODIMM.190 SODIMM.191 SODIMM.192 SODIMM.193 SODIMM.197 SODIMM.199 SODIMM.201 SODIMM.203 SODIMM.205 SODIMM.207 SODIMM.209 SODIMM.211 SODIMM.213 SODIMM.215 SODIMM.217 SODIMM.219 SODIMM.220 SODIMM.221 SODIMM.225 SODIMM.226 SODIMM.227 SODIMM.228 SODIMM.231 SODIMM.232 SODIMM.233 SODIMM.234 SODIMM.235 SODIMM.237 SODIMM.238 SODIMM.239 SODIMM.240 SODIMM.241 SODIMM.245 SODIMM.246 SODIMM.247 SODIMM.248 SODIMM.249 SODIMM.250 SODIMM.256 SODIMM.258 SODIMM.260 USB_Power_Switch.7 VLT.6 VLT.9 VLT.15 VLT.V

## Polygon pours and split planes (outlines as drawn)
VOUT_5V_carrier on Top Layer "VOUT_5V_CARRIER_L01_P005" (solid, pour order 5): 36.83,40.386 40.64,40.386 40.64,50.8 36.83,50.8
GND on Top Layer "GND_L01_P004" (solid, pour order 4): 87.249,60.833 91.059,60.833 91.059,46.482 91.059,46.355 101.727,46.355 102.235,45.085 102.235,43.053 87.249,43.053 87.249,43.434
VOUT_5V_carrier on Top Layer "VOUT_5V_CARRIER_L01_P000" (solid, pour order 0): 93.218,60.833 98.425,58.166 101.862,55.2 102.435,54.982 105.41,54.841 105.41,52.324 103.124,52.324 103.124,48.237 93.218,48.237
GND on Ground "GND_L03_P003" (solid, pour order 3): 25.908,27.305 25.908,116.713 176.149,116.713 176.149,27.305